# Altium PCB 2026.08.07.HMS.PD.CNHH.PcbDoc (part 1 of 2)
Units mm, origin at the board's own origin, x right, y up, seen from the top; angles counter-clockwise.
Board outline 110 x 110 mm, 2 copper layers (Top Layer, Bottom Layer); 168 components, 117 nets, 606 pads, 1355 vias.
Unrouted connection lines stored in the file: 4.
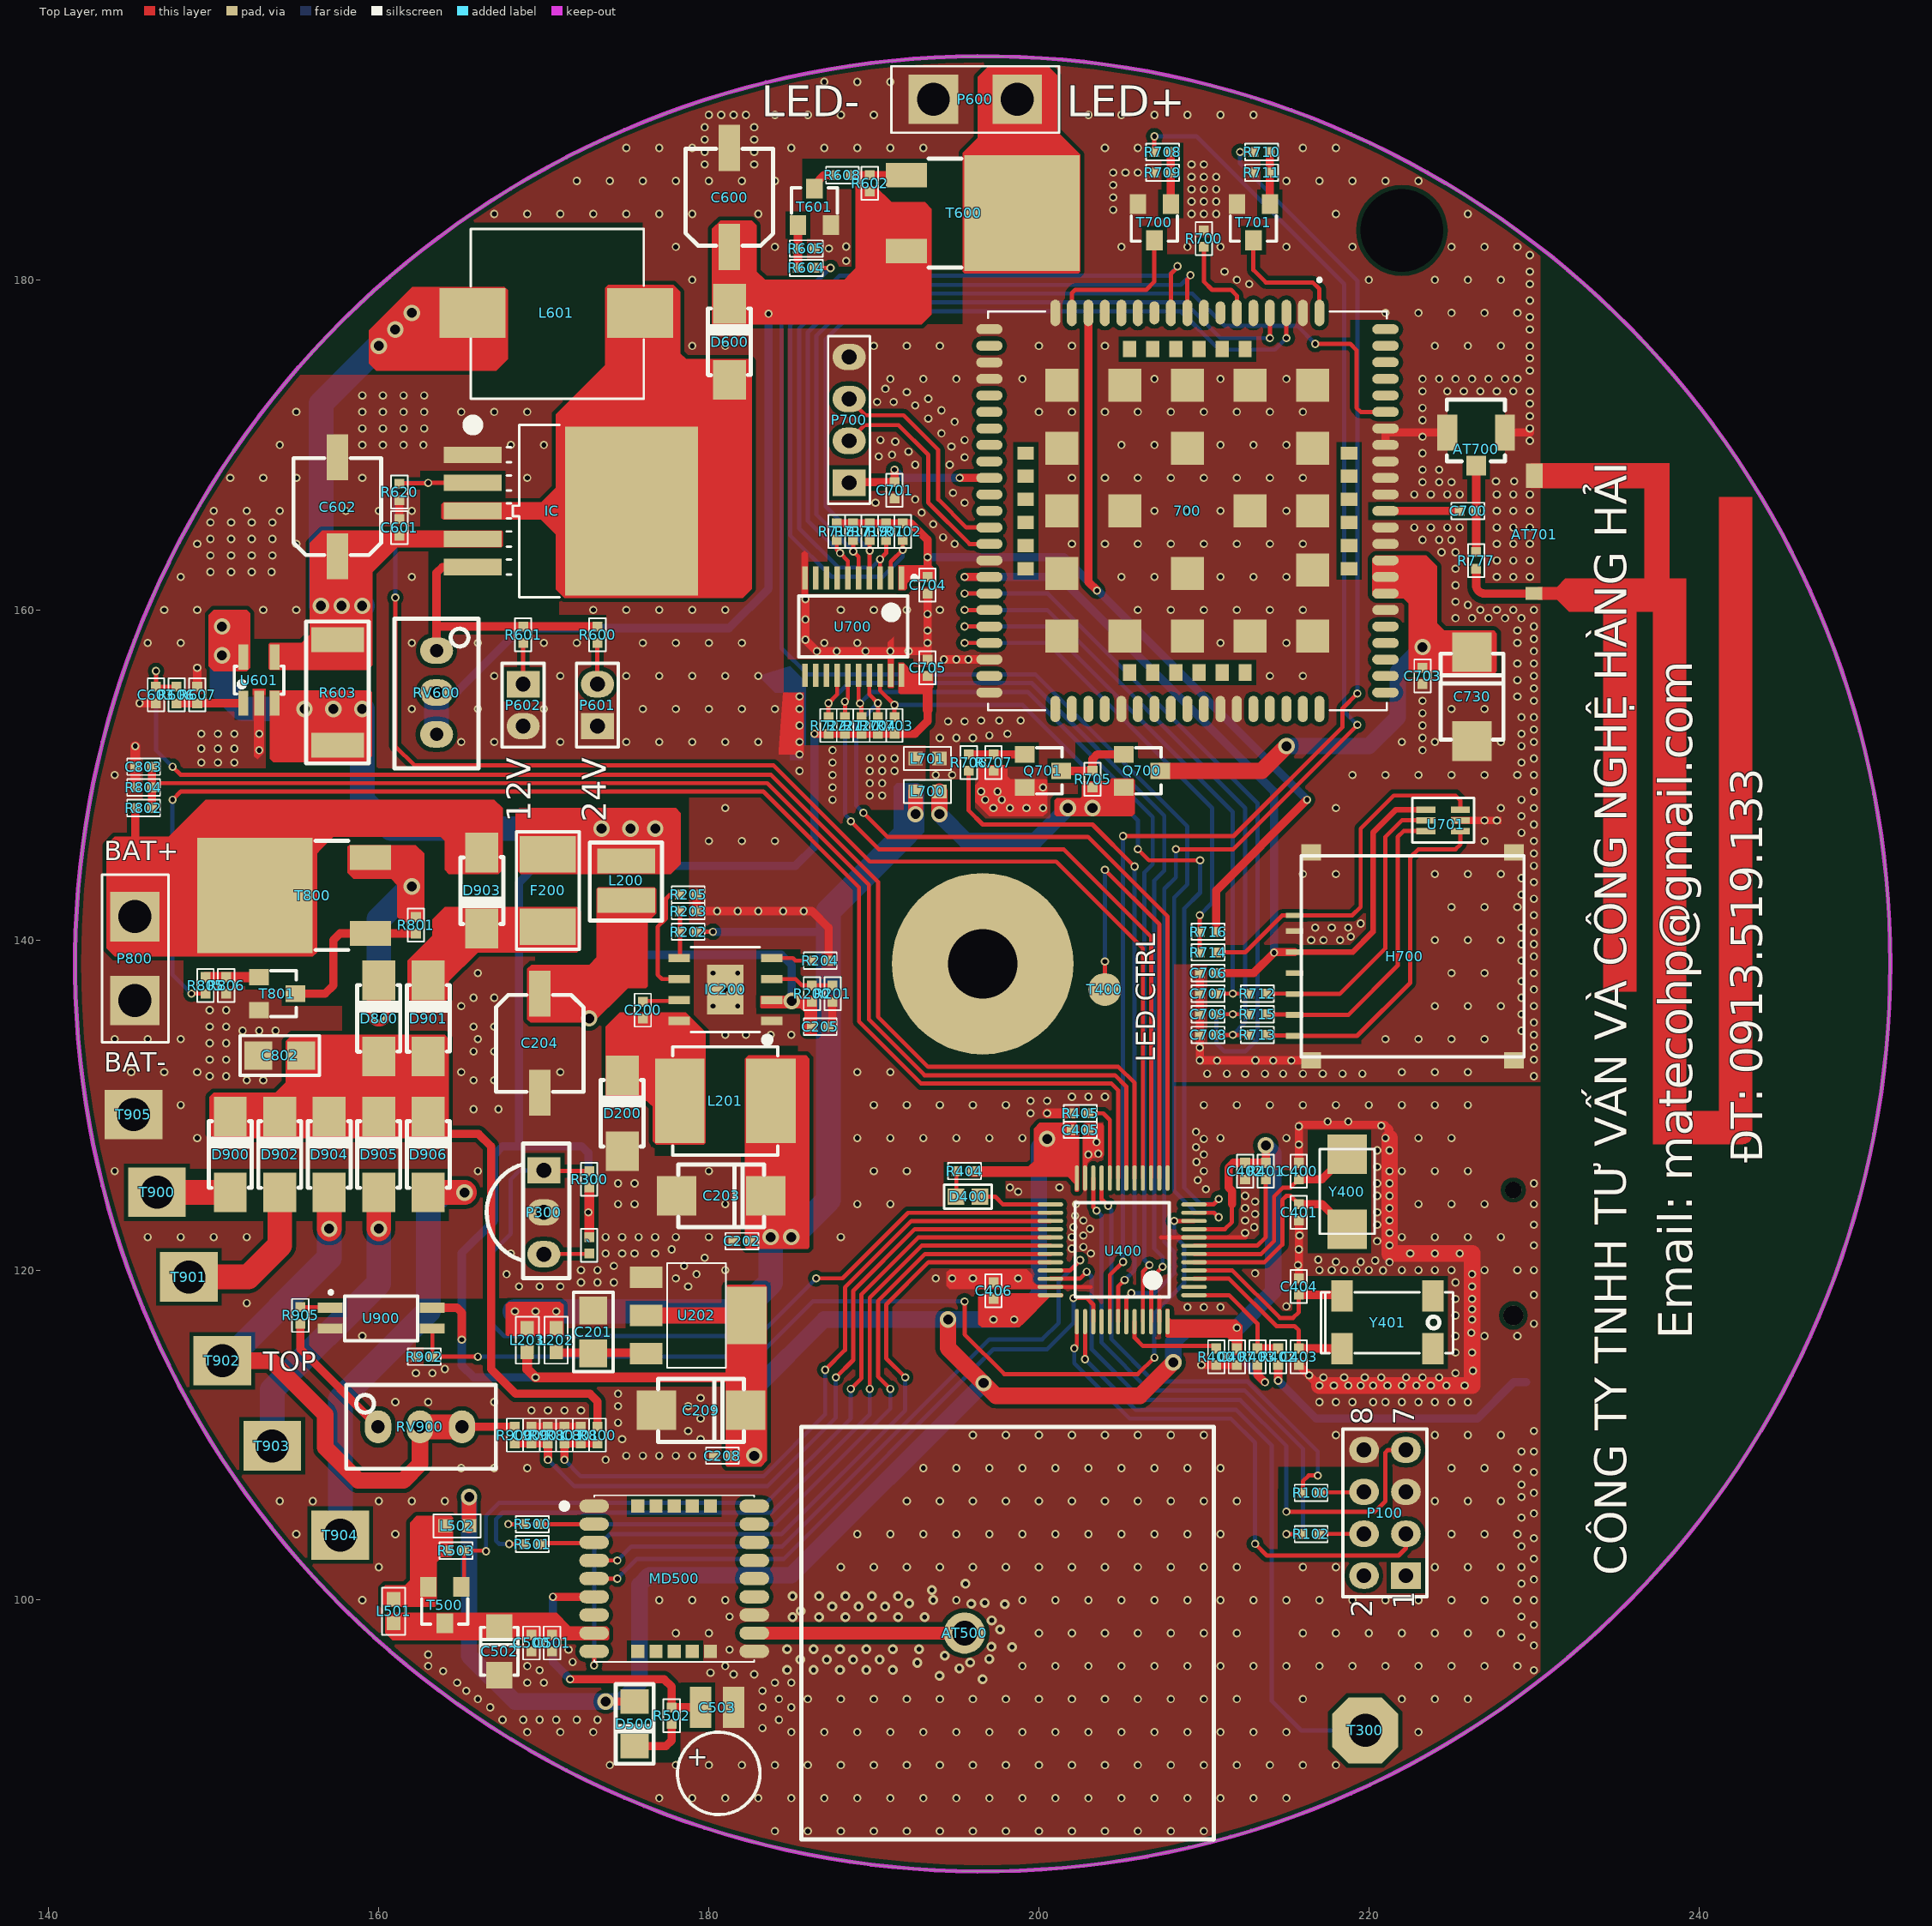
[diagram p0: Top Layer view]
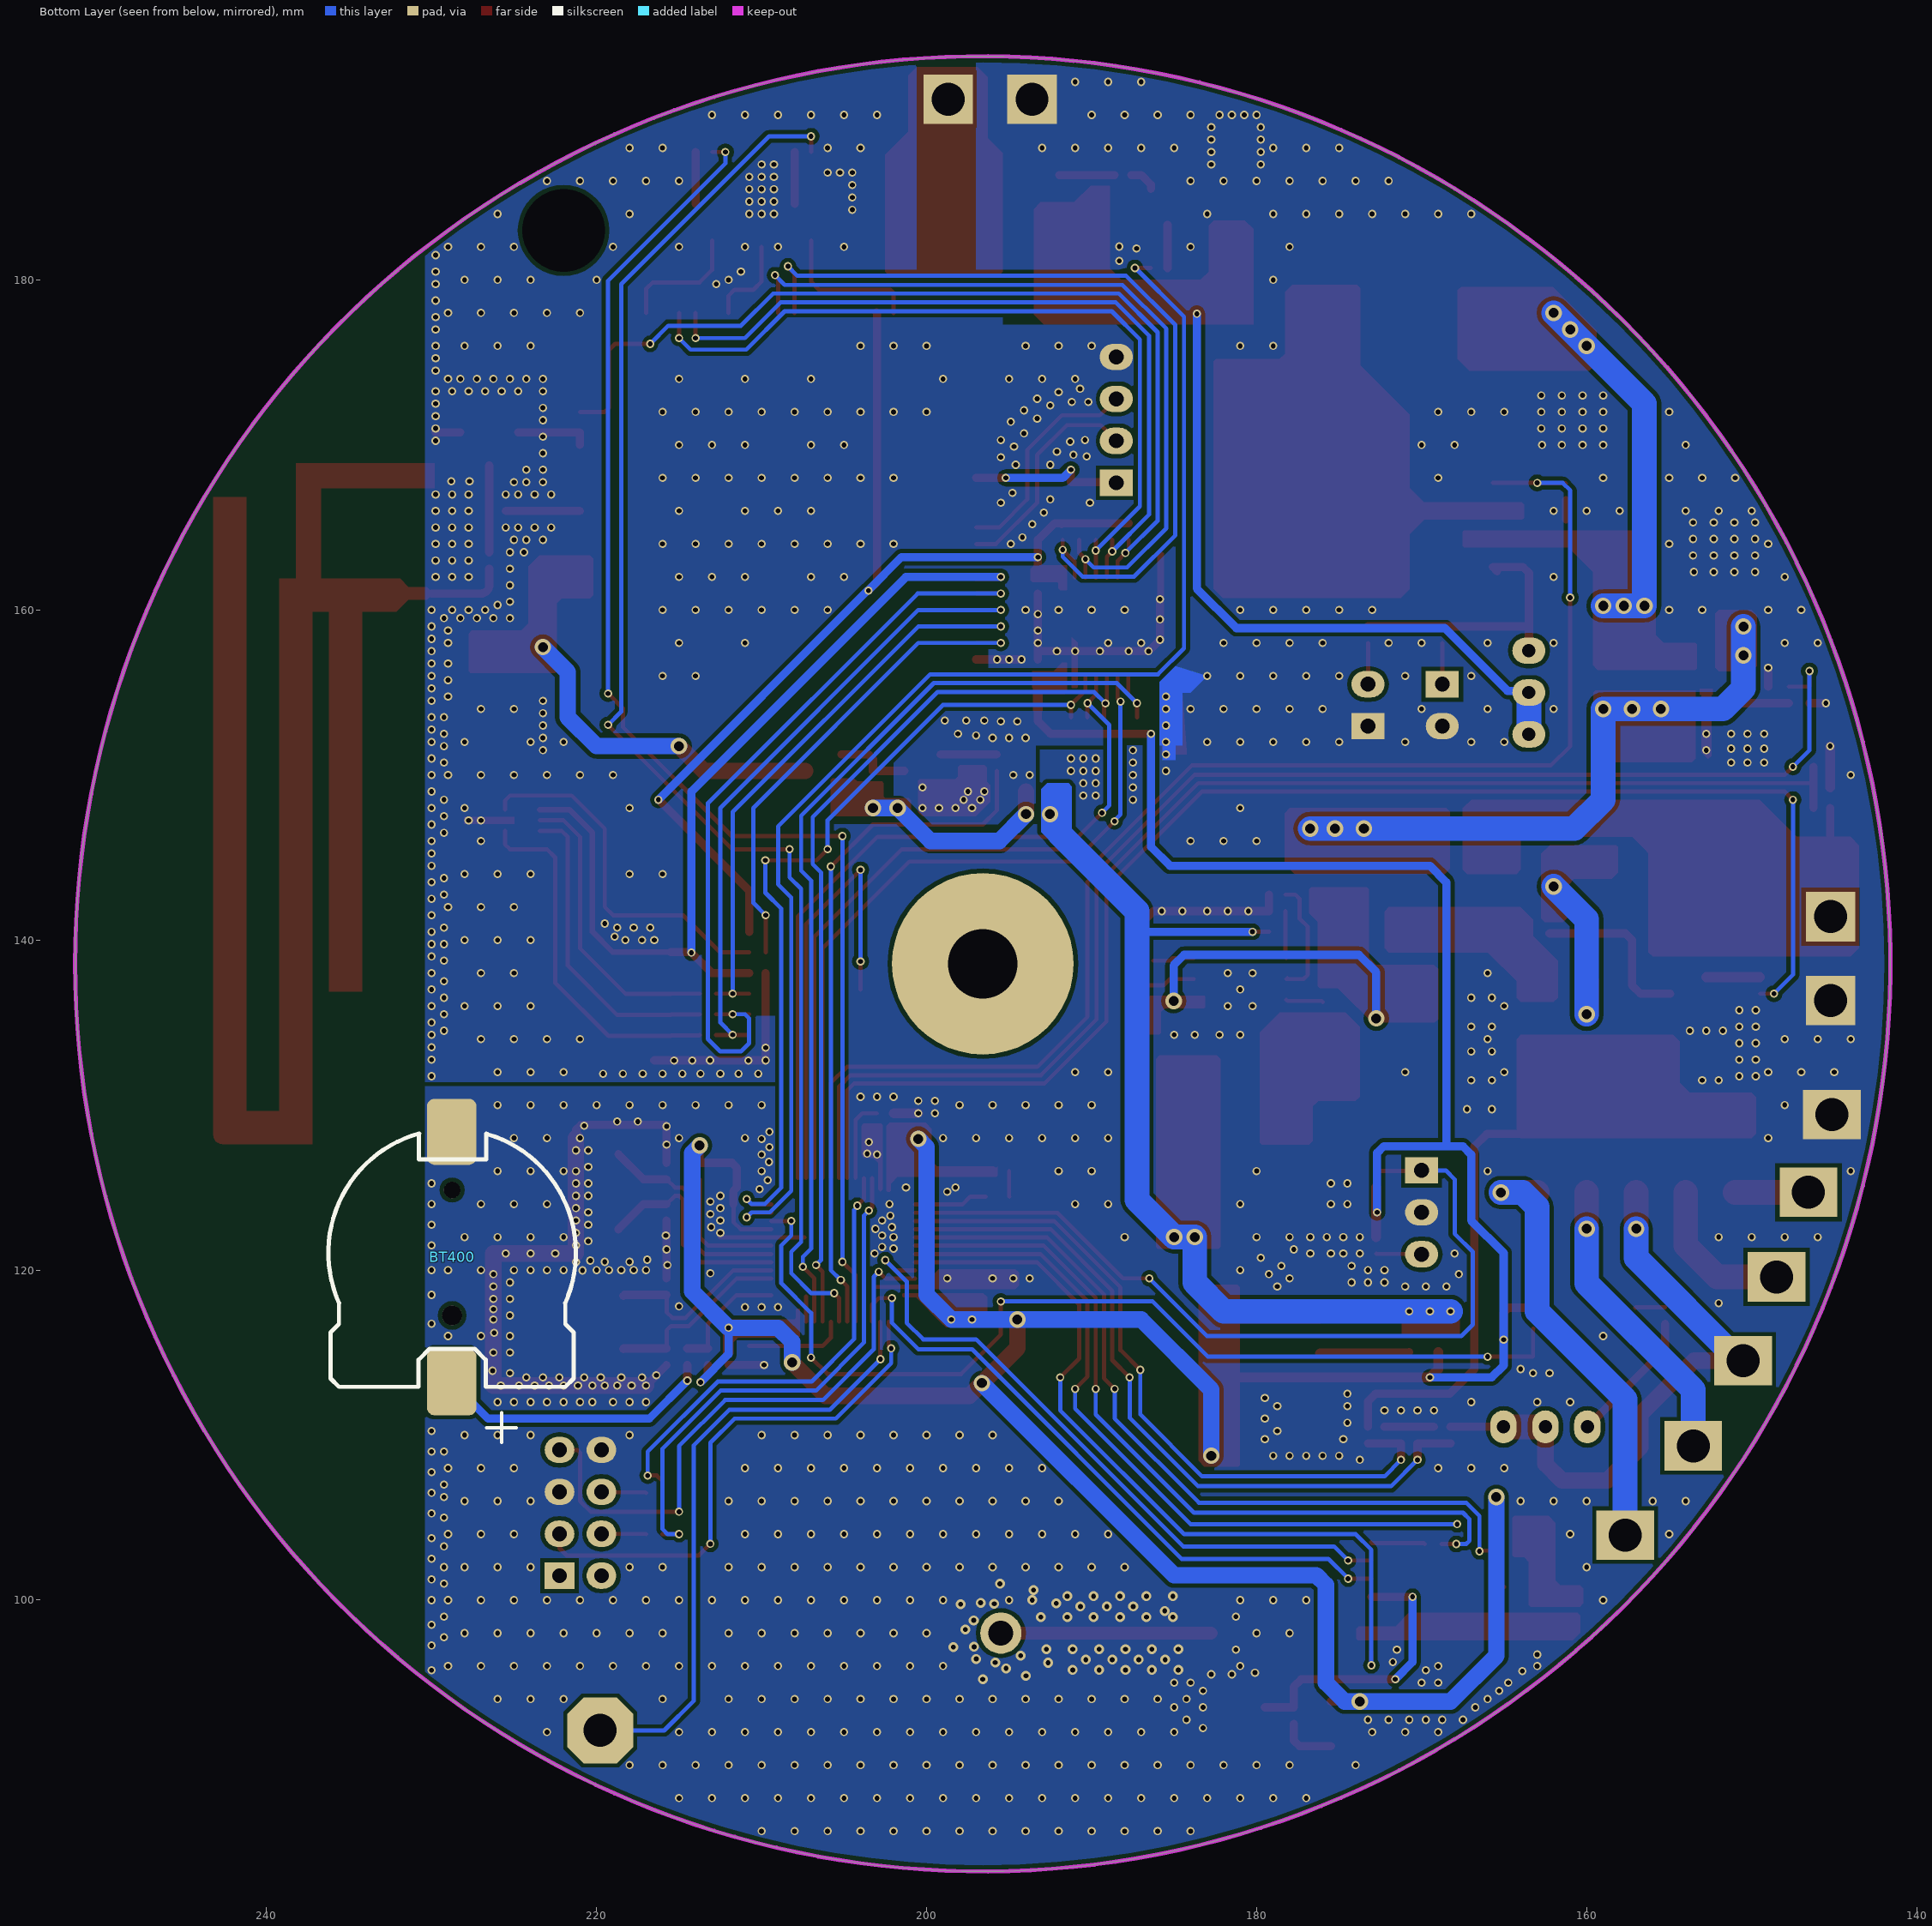
[diagram p1: Bottom Layer view, seen from below]
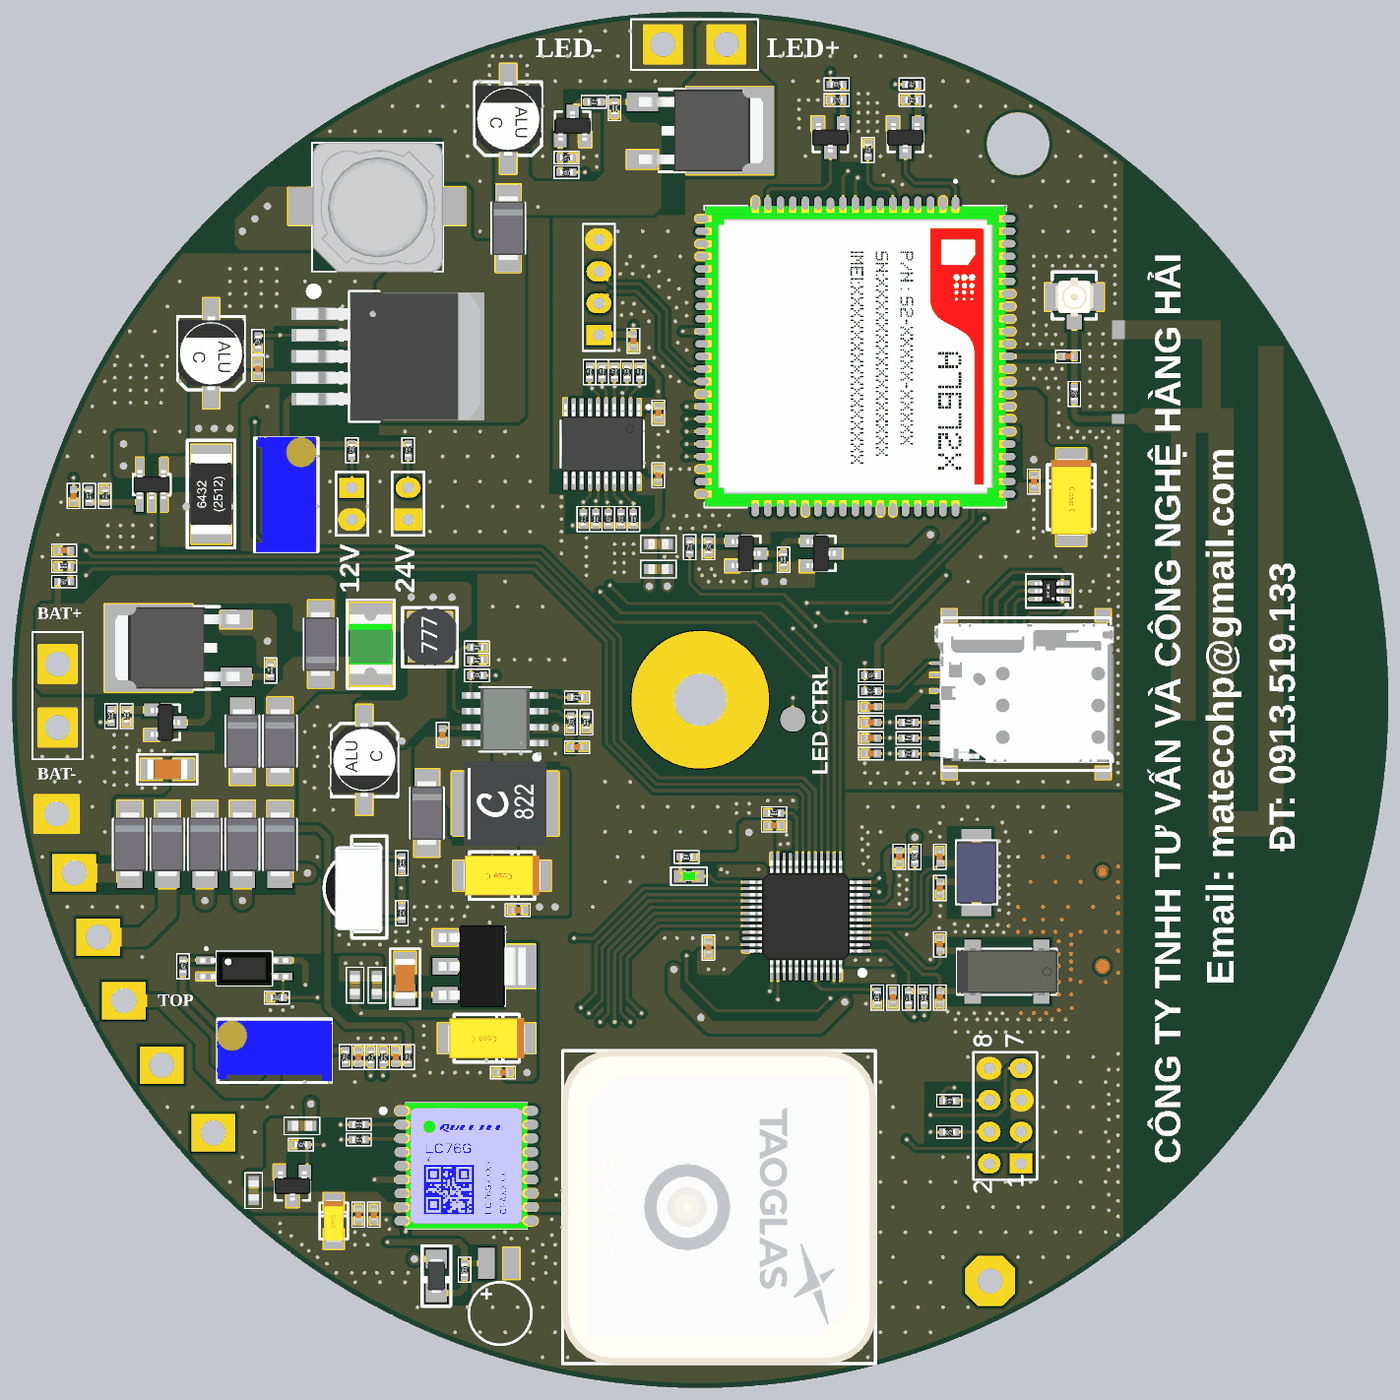
[diagram p3: 3D render of the assembled board from above, using the file's embedded part models]

## Layer stack, top to bottom
Top Solder: solder mask 0.0102, Solder Resist, Dk 3.5
Top Layer: signal copper 0.0356
Dielectric 1: dielectric 0.32, FR-4, Dk 4.8
Bottom Layer: signal copper 0.0356
Bottom Solder: solder mask 0.0102, Solder Resist, Dk 3.5

## Board outline
141.596,138.557 ccw(c196.596,138.557) 196.596,83.557 ccw(c196.596,138.557) 251.596,138.557 ccw(c196.596,138.557) 196.596,193.557 ccw(c196.596,138.557)

## Design rules (kind name [scope] priority, off if disabled: settings)
Clearance [not InComponent('U400','U701')] p1: gap=0.254
ComponentClearance [All] p1: gap=0 collisioncheckmode=3 verticalgap=0 showdistances=FALSE
HoleSize [All] p1: absolutevalues=TRUE maxlimit=25 minlimit=0.025 maxpercent=80.000 minpercent=20.000
PlaneConnect [All] p1: planeconnectstyle=Direct reliefexpansion=0.508 reliefentries=4 reliefconductorwidth=0.254 reliefairgap=0.254
PolygonConnect [All] p1: connectstyle=Direct reliefconductorwidth=0.254 reliefentries=4 polygonreliefangle="90 Angle" airgapwidth=0.254
RoutingVias [All] p1: holewidth=0.4 width=8 viastyle="Through Hole" minholewidth=0.3 minwidth=0.5 maxholewidth=0.6 maxwidth=1
SilkToSilkClearance [All] p1: silktosilkclearance=0
SilkToSolderMaskClearance [IsPad] p1: minsilkscreentomaskgap=0 clearancetoexposedcopper=TRUE
SolderMaskExpansion [All] p1: expansion=0.102
Width [All] p1: maxlimit=1.5 minlimit=0.254 preferedwidth=0.5
24 further rules are at their usual default settings.

## Classes and differential pairs
net class 50Ohm: NetAT500_1
component class HMS.Bootloader: P100 R100 R102
component class U_HMS.LC76G: AT500 C500 C501 C502 C503 D500 L501 L502 MD500 R500 R501 R502 R503 T500
component class HMS.LedCtrl: C600 C601 C602 C603 D600 IC L601 P600 P601 P602 R600 R601 R602 R603 R604 R605 R606 R607 R608 R620 RV600 T600 T601 U601
component class HMS.Power: C200 C201 C202 C203 C204 C205 C208 C209 D200 F200 IC200 L200 L201 L202 L203 R200 R201 R202 R203 R204 R205 U202
component class HMS.STM32L151CBT6: BT400 C400 C401 C402 C403 C404 C405 C406 C407 D400 R400 R401 R402 R403 R404 R405 T400 U400 Y400 Y401
component class U_HMS.SIM.A7677S: 700 AT700 AT701 C700 C701 C703 C704 C705 C706 C707 C708 C709 C730 g H700 L700 L701 P700 Q700 Q701 R700 R701 R702 R703 R704 R705 R706 R707 R708 R709 R710 R711 R712 R713 R714 R715 R716 R717 R718 R719 R720 R721 R722 R777 T700 T701 U700 U701
component class HMS_NiMHCharge: C801 C802 C803 D800 P800 R800 R801 R802 R803 R804 R805 R806 T800 T801
component class HMS_Solar: C900 D900 D901 D902 D903 D904 D905 D906 R900 R901 R902 R905 RV900 T900 T901 T902 T903 T904 T905 U900
component class HMS.VS1838B: ` P300 R300 T300

## Components (designator, comment, footprint, x,y, rotation, side; value= is the part's Value field where it differs from the comment)
700 "A767S2 S2-10AG4-Z31JP" SIM_A7672 217,178 r270 top
` "100R" RES_0402(1005) 172.75,121.5 r270 top
AT500 "GPS Antenna" "ANT GPS Passive" 195.5,98 r180 top
AT700 "NC" "IPEX SMD" 226.5,168.75 r270 top
AT701 "LTE Antenna" "Antenna LTE/4G PCB" 230,161 r0 top
BT400 "NC" "DE PIN NHO 3V3" 228.75,121.05 r270 bottom locked
C200 "104/50V" CAP_CERAMIC_0402(1005) 176,135.75 r90 top
C201 "106/50V" CAP_CERAMIC_1206(3216-18) 173,116.25 r270 top
C202 "104/50V" CAP_CERAMIC_0402(1005) 182,121.75 r0 top
C203 "107/10V" CAP_TANTAL_2312(6032-28) 180.75,124.5 r180 top
C204 "10uF/50V" CAP_ALUM_SMD_5054_TYPE_C 169.75,133.75 r90 top
C205 "104/50V" CAP_CERAMIC_0402(1005) 186.75,134.75 r180 top
C208 "104/50V" CAP_CERAMIC_0402(1005) 180.825,108.75 r0 top
C209 "107/10V" CAP_TANTAL_2312(6032-28) 179.525,111.5 r180 top
C400 "20pF/50V" CAP_CERAMIC_0402(1005) 215.75,126 r270 top
C401 "20pF/50V" CAP_CERAMIC_0402(1005) 215.75,123.5 r90 top
C402 "104/50V" CAP_CERAMIC_0402(1005) 212.5,126 r90 top
C403 "10pF/50V" CAP_CERAMIC_0402(1005) 215.75,114.75 r90 top
C404 "10pF/50V" CAP_CERAMIC_0402(1005) 215.75,119 r270 top
C405 "104/50V" CAP_CERAMIC_0402(1005) 202.5,128.5 r180 top
C406 "104/50V" CAP_CERAMIC_0402(1005) 197.25,118.75 r270 top
C407 "104/50V" CAP_CERAMIC_0402(1005) 212,114.75 r90 top
C500 "104/50V" CAP_CERAMIC_0402(1005) 169.25,97.4 r90 top
C501 "10pF/50V" CAP_CERAMIC_0402(1005) 170.5,97.4 r90 top
C502 "107/10V" CAP_TANTAL_1206(3216-18) 167.3,96.9 r270 top
C503 "NC" SPCAP0.22F 180.5,93.5 r180 top
C600 "10uF/50V" CAP_ALUM_SMD_5054_TYPE_C 181.25,185 r270 top
C601 "104/50V" CAP_CERAMIC_0402(1005) 161.25,165 r270 top
C602 "10uF/50V" CAP_ALUM_SMD_5054_TYPE_C 157.5,166.25 r270 top
C603 "104/50V" CAP_CERAMIC_0402(1005) 146.5,154.85 r90 top
C700 "100pF/50V" CAP_CERAMIC_0402(1005) 226,166 r180 top
C701 "104/50V" CAP_CERAMIC_0402(1005) 191.25,167.25 r270 top
C703 "104/50V" CAP_CERAMIC_0402(1005) 223.25,156 r90 top
C704 "104/50V" CAP_CERAMIC_0402(1005) 193.25,161.5 r90 top
C705 "104/50V" CAP_CERAMIC_0402(1005) 193.25,156.5 r270 top
C706 "104/50V" CAP_CERAMIC_0402(1005) 210.25,138 r0 top
C707 "20pF/50V" CAP_CERAMIC_0402(1005) 210.25,136.75 r0 top
C708 "20pF/50V" CAP_CERAMIC_0402(1005) 210.25,134.25 r0 top
C709 "20pF/50V" CAP_CERAMIC_0402(1005) 210.25,135.5 r0 top
C730 "107/10V" CAP_TANTAL_2312(6032-28) 226.25,154.75 r270 top
C801 "104/50V" CAP_CERAMIC_0402(1005) 172.25,110 r270 top
C802 "106/50V" CAP_CERAMIC_1206(3216-18) 154,133 r180 top
C803 "104/50V" CAP_CERAMIC_0402(1005) 145.75,150.5 r0 top
C900 "104/50V" CAP_CERAMIC_0402(1005) 169.25,110 r270 top
D200 "SS34" DO214AC_SMA_1808 174.75,129.5 r90 top
D400 "LED Red" LED_0603_GREEN 195.7,124.45 r0 top
D500 "1N4148W" DIODE_F03_1005 175.5,92.5 r270 top
D600 "SS54" DO214AC_SMA_1808 181.25,176.25 r90 top
D800 "SS34" DO214AC_SMA_1808 160,135.25 r90 top
D900 "SS34" DO214AC_SMA_1808 151,127 r90 top
D901 "SS34" DO214AC_SMA_1808 163,135.25 r90 top
D902 "SS34" DO214AC_SMA_1808 154,127 r90 top
D903 "SS34" DO214AC_SMA_1808 166.25,143 r270 top
D904 "SS34" DO214AC_SMA_1808 157,127 r90 top
D905 "SS34" DO214AC_SMA_1808 160,127 r90 top
D906 "SS34" DO214AC_SMA_1808 163,127 r90 top
F200 "1A/33V" MF-MSMF 170.25,143 r90 top
H700 "MUP-C7801-2" MUP-C7801 215.9,132.91 r90 top
IC "XL6019E1" TO-263-5 170.5,166 r270 top
IC200 "RY81020CP8" MK9019 181,137 r180 top
L200 "3.3uH" L2.1A_3.5_3.3 175,143.6 r180 top
L201 "10uH" L3A_7x7x3mm 181,130.25 r0 top
L202 "FBMJ1608HM230NT" Inductor_0603 170.75,115.75 r270 top
L203 "FBMJ1608HM230NT" Inductor_0603 169,115.75 r270 top
L501 "4A/23Ohm" Inductor_0603 160.9,99.323 r270 top
L502 "NC" Inductor_0603 164.75,104.5 r180 top
L601 "33uH" L3A_10x10x4mm 170.75,178 r0 top
L700 "FBMJ1608HM230NT" Inductor_0603 193.25,149 r0 top
L701 "FBMJ1608HM230NT" Inductor_0603 193.25,151 r0 top
MD500 "SIM65M-C" LC76G_GPS 173.05,105.7 r0 top
P100 "NC" HDR2X4 222.24,101.48 r90 top
P300 "VS1838B" IR_RECEIVER 170,123.5 r270 top
P600 "NC" H2_BIG 196.15,190.95 r180 top
P601 "24V" HDR1X2 173.25,154.23 r90 top
P602 "12V" HDR1X2 168.75,154.23 r270 top
P700 "NC" HDR1X4 188.5,171.52 r90 top
P800 "NC" H2_BIG 145.225,138.875 r270 top
Q700 "AO3415" SOT23-3 206.25,150.25 r270 top
Q701 "C1815" SOT23-3 200.25,150.25 r270 top
R100 "1K" RES_0402(1005) 216.5,106.5 r180 top
R102 "1K" RES_0402(1005) 216.5,104 r180 top
R200 "68K" RES_0402(1005) 186.25,136.75 r270 top
R201 "20K" RES_0402(1005) 187.5,136.75 r90 top
R202 "20K" RES_0402(1005) 178.75,140.5 r0 top
R203 "5.1K" RES_0402(1005) 178.75,141.75 r180 top
R204 "20K" RES_0402(1005) 186.75,138.75 r180 top
R205 "NC" RES_0402(1005) 178.75,142.75 r180 top
R300 "10K" RES_0402(1005) 172.75,125.5 r270 top
R400 "100K" RES_0402(1005) 210.75,114.75 r90 top
R401 "100K" RES_0402(1005) 213.75,126 r90 top
R402 "NC" RES_0402(1005) 214.5,114.75 r90 top
R403 "0R" RES_0402(1005) 213.25,114.75 r90 top
R404 "1K" RES_0402(1005) 195.5,126 r180 top
R405 "100K" RES_0402(1005) 202.5,129.5 r0 top
R500 "1K" RES_0402(1005) 169.3,104.6 r180 top
R501 "1K" RES_0402(1005) 169.3,103.4 r180 top
R502 "100R" RES_0402(1005) 177.75,93 r270 top
R503 "10K" RES_0402(1005) 164.675,103 r180 top
R600 "5.1K" RES_0402(1005) 173.25,158.5 r90 top
R601 "10K" RES_0402(1005) 168.75,158.5 r90 top
R602 "10K" RES_0402(1005) 189.75,185.85 r270 top
R603 "0.1R" RES_2512 157.5,155 r90 top
R604 "1K" RES_0402(1005) 185.9,180.725 r180 top
R605 "10K" RES_0402(1005) 185.9,181.9 r180 top
R606 "330R" RES_0402(1005) 147.75,154.85 r90 top
R607 "100K" RES_0402(1005) 149,154.85 r270 top
R608 "10K" RES_0402(1005) 188.1,186.35 r180 top
R620 "100K" RES_0402(1005) 161.25,167.15 r90 top
R700 "NC" RES_0402(1005) 210,182.5 r270 top
R701 "2K2" RES_0402(1005) 190.75,164.75 r90 top
R702 "2K2" RES_0402(1005) 191.75,164.75 r90 top
R703 "2K2" RES_0402(1005) 191.25,153 r270 top
R704 "2K2" RES_0402(1005) 190.25,153 r270 top
R705 "10K" RES_0402(1005) 203.25,149.75 r90 top
R706 "1K" RES_0402(1005) 195.75,150.75 r270 top
R707 "10K" RES_0402(1005) 197.25,150.75 r270 top
R708 "1K" RES_0402(1005) 207.5,187.75 r180 top
R709 "4.7K" RES_0402(1005) 207.5,186.5 r180 top
R710 "1K" RES_0402(1005) 213.5,187.75 r180 top
R711 "4.7K" RES_0402(1005) 213.5,186.5 r180 top
R712 "0R" RES_0402(1005) 213.25,136.75 r0 top
R713 "0R" RES_0402(1005) 213.25,134.25 r0 top
R714 "0R" RES_0402(1005) 210.25,139.25 r0 top
R715 "0R" RES_0402(1005) 213.25,135.5 r0 top
R716 "4.7K" RES_0402(1005) 210.25,140.5 r0 top
R717 "2K2" RES_0402(1005) 188.75,164.75 r90 top
R718 "2K2" RES_0402(1005) 187.75,164.75 r90 top
R719 "2K2" RES_0402(1005) 189.75,164.75 r90 top
R720 "2K2" RES_0402(1005) 189.25,153 r270 top
R721 "2K2" RES_0402(1005) 188.25,153 r270 top
R722 "2K2" RES_0402(1005) 187.25,153 r270 top
R777 "NC" RES_0402(1005) 226.5,163 r90 top
R800 "100K" RES_0402(1005) 173.25,110 r90 top
R801 "10K" RES_0402(1005) 162.25,140.9 r90 top
R802 "100K" RES_0402(1005) 145.75,148 r180 top
R803 "10K" RES_0402(1005) 171.25,110 r270 top
R804 "10K" RES_0402(1005) 145.75,149.25 r0 top
R805 "1K" RES_0402(1005) 149.5,137.25 r90 top
R806 "10K" RES_0402(1005) 150.75,137.25 r90 top
R900 "100K" RES_0402(1005) 168.25,110 r90 top
R901 "10K" RES_0402(1005) 170.25,110 r270 top
R902 "10K" RES_0402(1005) 162.75,114.75 r0 top
R905 "10K" RES_0402(1005) 155.25,117.25 r270 top
RV600 "204" RES_VAR_Type1 163.5,155 r270 top
RV900 "104" RES_VAR_Type1 162.5,110.5 r0 top
T300 "Test Point" TP 219.775,92.1 r0 top
T400 "Test Point" "Test Point SMD" 204,137 r90 top
T500 "AO3415" SOT23-3 164,99.7 r180 top
T600 "AOD409" TO252 197.5,184.05 r270 top
T601 "C1815" SOT23-3 186.4,184.425 r0 top
T700 "C1815" SOT23-3 207,183.5 r180 top
T701 "2SC1815" SOT23-3 213,183.5 r180 top
T800 "AOD409" TO252 153.968,142.7 r90 top
T801 "C1815" SOT23-3 153.85,136.75 r270 top
T900 "Test Point" TP_2 146.558,124.714 r180 top
T901 "Test Point" TP_2 148.488,119.583 r180 top
T902 "Test Point" TP_2 150.52,114.503 r180 top
T903 "Test Point" TP_2 153.543,109.347 r180 top
T904 "Test Point" TP_2 157.671,103.937 r180 top
T905 "Test Point" TP_2 145.15,129.425 r180 top
U202 "TLV1117LV33DCYR" LM1117-SOP 179.25,117.25 r270 top
U400 "STM32L151CBT6" LQFP48_L 205.05,121.225 r180 top locked
U601 "INA138NA/3K" SOT23-5 152.75,155.75 r0 top
U700 "TC7MPB9307FT(EL)" TSOP65P640X120-20N 188.75,159 r270 top
U701 "SMF05CT2G" SOT65P210X140-6N 224.5,147.25 r180 top
U900 "EL3H7(C)(TA)-G" "Opto small" 160.5,117.25 r0 top
Y400 "8Mhz" CRYSTAL_SMD_2PIN-5032 218.675,124.75 r90 top
Y401 "32.768KHz" ABS25-32768-6-T 221.125,116.825 r0 top

## Footprints (in the part's own frame and the unit in brackets; to place one, negate y for a bottom-side part, rotate by r counter-clockwise, add the part's x,y. Pads: shape width x height; smd on the part's side, far side on the other; paste and mask are expansions set on the pad)
ABS25-32768-6-T [mm] "CRYSTAL 32.768KHZ 6PF SMD"
  rect 1.3x1.9 smd: 1(-2.75,-1.6) 2(2.75,-1.6) 3(2.75,1.6) 4(-2.75,1.6)
  silkscreen extent -4.02,-1.85 3.98,1.83, body extent -4,-1.9 4,1.9, height 2.53
"ANT GPS Passive" [mm]
  round 2.5 hole 1.5: 1(0,0)
  silkscreen extent -15.1,-12.5 9.9,12.5, body extent -15.15,-12.55 9.95,12.55, height 4.73
"Antenna LTE/4G PCB" [mm]
  rect 1x0.77 smd paste+0 mask+0: 1(0,0)
  rect 1x1.5 smd paste+0 mask+0: 2(0.026,7.138)
  Top Layer region: 0.254,-0.38 1.397,-0.38 2.131,-1.114 4.216,-1.114 4.216,-24.126 6.215,-24.126 6.215,-1.114 7.216,-1.114 7.216,-33.362 12.67,-33.362 12.879,-33.32 13.056,-33.202 13.174,-33.025 13.216,-32.816 13.216,-32.816 13.216,5.843 11.214,5.843 11.214,-31.36 9.215,-31.36 9.215,0.888 8.217,0.888 8.217,7.885 -0.178,7.885 -0.178,6.387 6.713,6.387 6.713,0.888 1.902,0.888 1.4,0.385 0.257,0.385 0,0.128 0,-0.128
CAP_ALUM_SMD_5054_TYPE_C [mm]
  rect 2.8x1.3 smd: 1(3,0) 2(-3,0)
  silkscreen extent -2.95,-2.67 2.92,2.65, body extent -2.95,-2.65 2.95,2.65, height 5.41
CAP_CERAMIC_0402(1005) [mm] "Chip Inductor, Body 1.0x0.5mm, IPC High Density"
  rect 0.6x0.6 smd: 1(-0.5,0) 2(0.5,0)
  silkscreen extent -1,-0.5 1,0.5, body extent -0.5,-0.25 0.5,0.25, height 0.5
CAP_CERAMIC_1206(3216-18) [mm] "Chip Capacitor, Body 3.2x1.6mm, IPC High Density"
  rect 1.7x1.7 smd: 1(-1.3,0) 2(1.3,0)
  silkscreen extent -2.4,-1.2 2.4,1.2, body extent -1.6,-0.8 1.6,0.8, height 1
CAP_TANTAL_1206(3216-18) [mm] "Chip Capacitor, Body 3.2x1.6mm, IPC High Density"
  rect 1.6x1.6 smd: 1(-1.45,0) 2(1.45,0)
  silkscreen extent -1.45,-1.12 1.45,1.12, body extent -1.7,-0.8 1.7,0.8, height 1.65
CAP_TANTAL_2312(6032-28) [mm] "Chip Resistor, Body 6.0x3.2mm, IPC High Density"
  rect 2.4x2.4 smd: 1(-2.7,0) 2(2.7,0)
  silkscreen extent -2.6,-1.91 2.6,1.91, body extent -3.09,-1.6 3.09,1.6, height 2.69
CRYSTAL_SMD_2PIN-5032 [mm] "Crystal smd"
  rect 2.4x2.4 smd mask+0.025: 1(-2.275,0) 2(2.275,0)
  silkscreen extent -2.55,-1.67 2.58,1.65, body extent -2.5,-1.6 2.5,1.6, height 1.3
"DE PIN NHO 3V3" [mm]
  rrect30% 4x3 smd mask+0.051: 1(7.85,-0.025) 2(-7.325,-0.025)
  round 1 hole 1 unplated paste+0 mask+0: ""(-3.8,0)
  round 1.2 hole 1.2 unplated mask+0: ""(3.8,0)
  silkscreen extent -7.23,-7.5 11.5,7.5, body extent -9,-7.5 9.5,7.49, height 3.92
DIODE_F03_1005 [mm]
  rect 1.5x1.7 smd: 1(-1.35,0) 2(1.35,0)
  silkscreen extent -2.4,-1.14 2.41,1.16, body extent -1.35,-0.7 1.35,0.7, height 0.73
DO214AC_SMA_1808 [mm] "Diode B340, Diode M7"
  rect 2.4x2 smd: 1(-2.3,0) 2(2.3,0)
  silkscreen extent -2.02,-1.3 2.02,1.3, body extent -2.6,-1.3 2.6,1.3, height 2.42
H2_BIG [mm] "Euro Block"
  rect 3x3 hole 2: 1(-2.54,0) 2(2.54,0)
  silkscreen extent -5.08,-2 5.08,2.03, body extent -3.81,-1.27 3.81,1.27, height 1.5
HDR1X2 [mm] "Connector; Header; 2 Position"
  rect 1.6x2 hole 0.9: 1(-1.27,0)
  oval 1.6x2 hole 0.9: 2(1.27,0)
  silkscreen extent -2.54,-1.27 2.54,1.27, body extent -2.54,-1.27 2.54,1.27, height 7
HDR1X4 [mm] "Connector; Header; 4 Position"
  rect 1.6x2 hole 0.9: 1(-3.81,0)
  oval 1.6x2 hole 0.9: 2(-1.27,0) 3(1.27,0) 4(3.81,0)
  silkscreen extent -5.08,-1.27 5.08,1.27, body extent -5.08,-1.27 5.08,1.27, height 7
HDR2X4 [mm] "Connector; Header; 4x2 Position"
  rect 1.6x1.8 hole 0.9: 1(0,0)
  oval 1.6x1.8 hole 0.9: 2(0,2.54) 3(2.54,0) 4(2.54,2.54) 5(5.08,0) 6(5.08,2.54) 7(7.62,0) 8(7.62,2.54)
  silkscreen extent -1.27,-1.27 8.89,3.81, body extent -1.27,-1.27 8.89,3.81, height 7
Inductor_0603 [mil] "HK1608R22J-T"
  rect 34x32 smd paste+0 mask+0: 1(-28.54,0) 2(28.46,0)
  silkscreen extent -56,-28 56,28, body extent -32,-16 31,16, height 37
"IPEX SMD" [mm] "IPEX Connector SMD"
  rect 1.2x1.2 smd: 1(0,0)
  rect 2.2x1.2 smd: 2(-2,1.75) 2(-2,-1.75)
  silkscreen extent -4,-1.78 -0.25,1.75, body extent -3.55,-1.5 -0.45,1.5, height 1.25
IR_RECEIVER [mm] "TO, Flat Index; 3 In-Line, Axial Leads; Body Dia. 4.8mm; Leads 0.55 x 0.51 mm (max)"
  rect 1.6x2 hole 0.9: 1(-2.54,0)
  oval 1.6x2 hole 0.9: 2(0,0) 3(2.54,0)
  silkscreen extent -4.17,-3.46 3.99,1.55, body extent -3.62,-3.6 3.62,1.2, height 8.8
L2.1A_3.5_3.3 [mm]
  rect 3.5x1.5 smd: 1(0,-1.2) 2(0,1.2)
  silkscreen extent -2.16,-2.31 2.21,2.41, body extent -2.1,-2.31 2.1,2.31, height 3.47
L3A_7x7x3mm [mm]
  rect 3x5.12 smd: 1(-2.764,0) 2(2.764,0)
  silkscreen extent -3.18,-3.28 3.18,3.28, body extent -3.28,-3.38 3.28,3.38, height 6.1
L3A_10x10x4mm [mm]
  rect 4x3 smd: 1(-5.08,0) 2(5.08,0)
  silkscreen extent -5.18,-5.21 5.31,5.08, body extent -5.12,-5.28 5.28,5.12, height 6.25
LC76G_GPS [mm] "Modlue GNSS"
  rrect100% 1.8x0.8 smd mask+0.05: 1(0,0) 2(0,-1.1) 3(0,-2.2) 4(0,-3.3) 5(0,-4.4) 6(0,-5.5) 7(0,-6.6) 8(0,-7.7) 9(0,-8.8) 10(9.7,-8.8) 11(9.7,-7.7) 12(9.7,-6.6) 13(9.7,-5.5) 14(9.7,-4.4) 15(9.7,-3.3) 16(9.7,-2.2) 17(9.7,-1.1) 18(9.7,0)
  rect 0.8x0.8 smd mask+0.05: 19(7.05,0) 20(5.95,0) 21(4.85,0) 22(3.75,0) 23(2.65,0) 24(2.65,-8.8) 25(3.75,-8.8) 26(4.85,-8.8) 27(5.95,-8.8) 28(7.05,-8.8)
  silkscreen extent -1.9,-9.45 9.7,0.65, body extent 0,-9.45 9.7,0.65, height 2.4
LED_0603_GREEN [mm] "Chip Capacitor, Body 1.6x0.8mm, IPC High Density"
  rect 1x1 smd: 1(-0.725,0) 2(0.725,0)
  silkscreen extent -1.45,-0.73 1.45,0.72, body extent -0.8,-0.4 0.8,0.4, height 0.6
LM1117-SOP [mm]
  rect 1.3x2 smd: 1(-2.3,-3.048) 2(0,-3.048) 3(2.3,-3.048)
  rect 3.5x2.4 smd: 2(0,3.048)
  silkscreen extent -3.18,-1.78 3.18,1.78, body extent -3.25,-3.56 3.25,3.4, height 1.68
LQFP48_L [mm] "Thin QFP, 48-Leads, Body 7x7mm, Pitch 0.5mm, IPC High Density"
  round 0.8 on Top Overlay: 0(-4.5,4.5)
  oval 1.55x0.25 smd: 1(-4.35,2.75) 2(-4.35,2.25) 3(-4.35,1.75) 4(-4.35,1.25) 5(-4.35,0.75) 6(-4.35,0.25) 7(-4.35,-0.25) 8(-4.35,-0.75) 9(-4.35,-1.25) 10(-4.35,-1.75) 11(-4.35,-2.25) 12(-4.35,-2.75) 25(4.35,-2.75) 26(4.35,-2.25) 27(4.35,-1.75) 28(4.35,-1.25) 29(4.35,-0.75) 30(4.35,-0.25) 31(4.35,0.25) 32(4.35,0.75) 33(4.35,1.25) 34(4.35,1.75) 35(4.35,2.25) 36(4.35,2.75)
  oval 0.25x1.55 smd: 13(-2.75,-4.35) 14(-2.25,-4.35) 15(-1.75,-4.35) 16(-1.25,-4.35) 17(-0.75,-4.35) 18(-0.25,-4.35) 19(0.25,-4.35) 20(0.75,-4.35) 21(1.25,-4.35) 22(1.75,-4.35) 23(2.25,-4.35) 24(2.75,-4.35) 37(2.75,4.35) 38(2.25,4.35) 39(1.75,4.35) 40(1.25,4.35) 41(0.75,4.35) 42(0.25,4.35) 43(-0.25,4.35) 44(-0.75,4.35) 45(-1.25,4.35) 46(-1.75,4.35) 47(-2.25,4.35) 48(-2.75,4.35)
  silkscreen extent -2.85,-2.85 2.85,2.85, body extent -4.5,-4.5 4.5,4.5, height 1.6
MF-MSMF [mm]
  rect 2.2x3.4 smd: 1(-2.2,0) 2(2.2,0)
  silkscreen extent -3.56,-1.91 3.56,1.91, body extent -2.36,-1.74 2.37,1.74, height 1.03
MK9019 [mm]
  rect 1.3x0.508 smd paste+0 mask+0: 1(-2.803,1.905) 2(-2.803,0.635) 3(-2.803,-0.635) 4(-2.803,-1.905) 5(2.803,-1.905) 6(2.803,-0.635) 7(2.803,0.635) 8(2.803,1.905)
  rect 2.2x3 smd paste+0 mask+0: EPAD(0,0)
  silkscreen extent -2.67,-2.58 2.08,3.17, body extent -3.1,-2.45 3.1,2.45, height 1.76
MUP-C7801 [mm] "Push-Push NANO-SIM Card"
  rect 0.35x1.04 smd: 1(6.36,0.4) 2(3.82,0.4) 3(1.28,0.4) 5(7.63,0.4) 6(5.09,0.4) 7(2.55,0.4)
  rect 1x1.2 smd: 5(-0.2,-0.6) 5(-0.2,-12.9) 5(12.4,-0.6) 5(12.4,-12.9)
  rect 0.3x1.04 smd: 8(8.58,0.4)
  silkscreen extent 0,-13.5 12.2,0, body extent 0.57,-13.75 11.79,0.6, height 1.25
"Opto small" [mm]
  rect 1.5x0.6 smd: 1(-3.454,0.468) 2(-3.454,-0.802) 3(2.746,-0.802) 4(2.746,0.468)
  silkscreen extent -3.5,-1.53 1.85,1.5, body extent -3.85,-1.53 3.15,1.17, height 2.01
RES_0402(1005) [mm] "Chip Inductor, Body 1.0x0.5mm, IPC High Density"
  rect 0.6x0.6 smd: 1(-0.5,0) 2(0.5,0)
  silkscreen extent -1,-0.5 1,0.5, body extent -0.5,-0.25 0.5,0.25, height 0.35
RES_2512 [mm]
  rect 1.5x3.2 smd: 1(-3.2,0) 2(3.2,0)
  silkscreen extent -4.3,-1.9 4.3,1.9, body extent -3.2,-1.6 3.2,1.6, height 0.6
RES_VAR_Type1 [mm] "Bien tro vi chinh"
  oval 1.6x2 hole 0.8: 1(-2.54,0) 2(0,0) 3(2.54,0)
  silkscreen extent -4.47,-2.54 4.6,2.54, body extent -4.54,-2.4 4.66,2.4, height 12.02
SIM_A7672 [mm]
  oval 1.6x0.6 smd: 1(0,0) 2(0,-1) 3(0,-2) 4(0,-3) 5(0,-4) 6(0,-5) 8(0,-7) 9(0,-8) 10(0,-9) 12(0,-11) 13(0,-12) 14(0,-13) 15(0,-14) 16(0,-15) 17(0,-16) 35(24,-16) 36(24,-15) 37(24,-14) 38(24,-13) 39(24,-12) 40(24,-11) 41(24,-10) 42(24,-9) 43(24,-8) 44(24,-7) 45(24,-6) 46(24,-5) 47(24,-4) 48(24,-3) 49(24,-2) 50(24,-1) 51(24,0)
  oval 1.4x0.6 smd: 7(0,-6) 11(0,-10)
  oval 0.6x1.6 smd: 18(4,-20) 19(5,-20) 20(6,-20) 21(7,-20) 22(8,-20) 23(9,-20) 24(10,-20) 25(11,-20) 26(12,-20) 27(13,-20) 28(14,-20) 29(15,-20) 30(16,-20) 31(17,-20) 32(18,-20) 33(19,-20) 34(20,-20) 52(20,4) 53(19,4) 54(18,4) 55(17,4) 56(16,4) 57(15,4) 58(14,4) 59(13,4) 60(12,4) 61(11,4) 62(10,4) 63(9,4) 64(8,4) 65(7,4) 66(6,4) 67(5,4) 68(4,4) 89(0.99,-20) 90(1.99,-20) 91(3,-20) 92(21,-20) 93(22,-20) 94(23,-20) 95(23,4) 96(22,4) 97(21,4) 98(2.99,4) 99(1.99,4) 100(0.99,4)
  rect 2x2 smd: 69(4.389,-0.4) 70(4.389,-4.2) 71(4.389,-8) 72(4.389,-11.8) 73(4.389,-15.6) 74(8.189,-15.6) 75(11.989,-15.6) 76(15.789,-15.6) 77(19.589,-15.6) 78(19.589,-11.8) 79(19.589,-8) 80(19.589,-4.2) 81(19.589,-0.4) 82(15.589,-0.4) 83(11.989,-0.4) 84(8.189,-0.4) 85(8.189,-8) 86(11.989,-11.8) 87(15.789,-8) 88(11.989,-4.2)
  rect 1x0.8 smd: 101(2.19,-4.5) 102(2.19,-5.9) 103(2.19,-7.3) 104(2.19,-8.7) 105(2.19,-10.1) 106(2.19,-11.5) 113(21.79,-11.5) 114(21.79,-10.1) 115(21.79,-8.7) 116(21.79,-7.3) 117(21.79,-5.9) 118(21.79,-4.5)
  rect 0.8x1 smd: 107(8.5,-17.8) 108(9.9,-17.8) 109(11.3,-17.8) 110(12.7,-17.8) 111(14.1,-17.8) 112(15.5,-17.8) 119(15.5,1.8) 120(14.1,1.8) 121(12.7,1.8) 122(11.3,1.8) 123(9.9,1.8) 124(8.5,1.8)
  silkscreen extent -2.1,-20.07 24.07,4.08, body extent 0,-20 24,4, height 3.02
SOT23-3 [mm]
  round 0.5 on Top Overlay: 1(-1.016,0)
  rect 1x1.2 smd: 1(-1,-1.1) 2(1,-1.1) 3(0,1.1)
  silkscreen extent -1.4,-0.38 1.4,1.15, body extent -1.46,-1.17 1.46,1.17, height 1
SOT23-5 [mm]
  rect 0.6x1.524 smd: 1(-0.95,-1.4) 2(0,-1.4) 3(0.95,-1.4) 4(0.95,1.4) 5(-0.95,1.4)
  silkscreen extent -1.5,-0.85 1.5,0.85, body extent -1.46,-1.17 1.46,1.17, height 1
SOT65P210X140-6N [mm] "SOT23, 6-Leads, Body 2.00x2.10mm, Pitch 0.65mm, IPC Medium Density"
  round 0.4 on Top Overlay: 0(-1.4,1.1)
  rect 1.15x0.4 smd: 1(-1.05,0.65) 2(-1.05,0) 3(-1.05,-0.65) 4(1.05,-0.65) 5(1.05,0) 6(1.05,0.65)
  silkscreen extent -1.88,-1.35 1.88,1.35, body extent -1.13,-1 1.13,1, height 1
SPCAP0.22F [mm]
  rect 1.3x2.5 smd: 1(1,0) 2(-1,0)
  silkscreen extent -2.6,1.5 2.4,6.5
"Test Point SMD" [mm]
  round 2 smd: 1(0,0)
TO252 [mm]
  rect 1.5x2.5 smd: 1(-2.3,-5.532) 3(2.3,-5.532)
  rect 7x7 smd: 2(0,1.468)
  silkscreen extent -3.3,-4.19 3.3,-2.2, body extent -3.27,-5.81 3.27,4.13, height 2.41
TO-263-5 [mm]
  rect 1x3.5 smd paste+0 mask+0: 1(-3.4,-4.815) 2(-1.7,-4.815) 3(0,-4.815) 4(1.7,-4.815) 5(3.4,-4.815)
  rect 10.236x8.071 smd paste+0 mask+0: 6(0,4.815)
  silkscreen extent -5.33,-4.93 5.22,0.46, body extent -5.09,-6.19 5.09,8.49, height 4.68
TP [mm] "TestPoint"
  oct 4x4 hole 2: 1(0,0)
TP_2 [mm] "TestPoint"
  rect 3.5x3 hole 2: 1(0,0)
TSOP65P640X120-20N [mm] "TSOP, 20-Leads, Body 6.50x4.40mm, Pitch 0.65mm, IPC Medium Density"
  rect 1.4x0.35 smd: 1(-2.95,2.925) 2(-2.95,2.275) 3(-2.95,1.625) 4(-2.95,0.975) 5(-2.95,0.325) 6(-2.95,-0.325) 7(-2.95,-0.975) 8(-2.95,-1.625) 9(-2.95,-2.275) 10(-2.95,-2.925) 11(2.95,-2.925) 12(2.95,-2.275) 13(2.95,-1.625) 14(2.95,-0.975) 15(2.95,-0.325) 16(2.95,0.325) 17(2.95,0.975) 18(2.95,1.625) 19(2.95,2.275) 20(2.95,2.925)
  silkscreen extent -3.07,-3.3 1.85,3.83, body extent -3.2,-3.25 3.2,3.25, height 1

## Part data
700: library part SIM_A7672
` R502: library part Res1, "RES 100 OHM 1% 1/8W 0402"
AT500: library part "Antenna GPS Passive", "SWG018-35, Passive antenna 25x25x4mm, pin length 3.5mm, Three-proof varnish"
AT700: library part IPEX-AT, "IPEX SMD"
AT701: library part "Antenna GSM/LTE PCB"
BT400: library part Battery
C200 C202 C500 C501 C603 C801 C803 C900: library part "Cap Cer 0603 (1608)", "CAP CER 0.1UF 50V X5R 0402"
C201: library part CL31A106KOHNNNE, "CAP Ceramic 106/50V 10% 1206"
C203 C730: library part "Cap Tantal 2312 (6032-28)", "Capacitor Tantalum 100uF/10V 2312(6032-28)"
C204: library part UWT1C221MCL1GS, "Capacitor Alum 10uF/50V SMD 5x5.4mm"
C205 C208 C704 C705: library part Cap, "CAP CER 0.1UF 50V X5R 0402"
C209: library part UWT1C221MCL1GS, "Cap Tantal 10uF/6.3V 10% 1206"
C400 C401: library part "Cap Cer 0603 (1608)", "CAP CER 20PF 50V C0G/NP0 0402"
C402 C405 C406 C407: library part C0603C104K5RACTU, "CAP CER 0.1UF 50V X5R 0402"
C403: library part "Cap Cer 0603 (1608)", "CAP CER 10PF 50V C0G/NP0 0402"
C404: library part "Cap Cer 0603 (1608)", "Capacitor Ceramic 10pF/50V 10% 0603"
C502: library part "Cap Tantal 2312 (6032-28)", "Cap Tantal 10uF/6.3V 10% 1206"
C503: library part DCK-3R3E224U-E
C600 C602: library part "Cap Tantal 2917 (7343-31)", "Capacitor Alum 10uF/50V SMD 5x5.4mm"
C601: library part "Cap Cer 0805 (2012)", "CAP CER 0.1UF 50V X5R 0402"
C700: library part CC0402FRNPO9BN101, "CAP CER 100PF 50V C0G/NPO 0402"
C701 C706: library part CC0603KPX7R9BB104, "CAP CER 0.1UF 50V X5R 0402"
C703: library part C0603C104K5RACTU, "T? Ceramic 104/50V 10% 0603"
C707 C708 C709: library part CC0402GRNPO9BN200, "CAP CER 20PF 50V C0G/NPO 0402"
C802: library part Cap, "CAP Ceramic 106/50V 10% 1206"
D200 D800 D900 D901 D902 D903 D904 D905 D906: library part "Diode B340A", "Diode Schottky 3A/40V DO-214AB"
D400: library part "LED 3mm", "LED RED SMD 0402"
D500: library part "Diode F03", "1N4148 T4 SOD-123/1206 1N4148W"
D600: library part "Diode B340A", "Diode Schottky 5A/40V DO-214AB"
F200: library part RKEF110, "PTC RESET FUSE 33V 1A SMD 1812"
H700: library part MUP-C7801, "Nano Sim card Socket"
IC: "XL6019E1 IC Boost 5A TO-263-5"
IC200: library part MK9019, "100V Input, Ultra-Low IQ, Synchronous Buck Converter"
L200: library part Inductor, "Inductor SMD 3.3uH CD43-3R3 3.5*3*2.1mm"
L201: library part "Inductor Iron", "Inductor 10uH 7x7x4mm"
L202 L203: library part CBC2012T470M, "Inductor Ferrites 4A SMD 0603"
L501: library part FBMJ1608HM230NT, "Inductor Ferrites 4A SMD 0603"
L502: library part CBC2012T470M, "47nH"
L601: library part CBC2012T470M, "INDUCTOR 33uH SMD CDRH127-330"
L700 L701: library part CBC2012T470M, "INDUCTOR 200nH 20% 0805 SMD"
MD500: library part LC76G, "Compact GNSS Module"
P100: library part "Header 4X2", "Header, 4-Pin, Dual row"
P300: library part "Header 3", "Diode Infrared Receiver 38Khz"
P600 P601 P602 P800: library part "Header 2", "Header, 2-Pin"
P700: library part USB-M
Q700: library part 2N3906, "Mosfet P Channel"
Q701: library part 2N3904, "Trans C1815 NPN 0.15A/50V SMD SOT23"
R100 R102 R404 R604 R706 R710: library part Res1, "RES 1K OHM 1% 1/8W 0402"
R200: library part Res1, "RES 68K OHM 5% 1/8W 0402"
R201 R204: library part Res1, "RES 20K OHM 1% 1/8W 0402"
R202: library part Res1, "RES 20K OHM 5% 1/8W 0402"
R203 R600: library part Res1, "RES 5.1K OHM 5% 1/8W 0402"
R300 R601 R602 R605 R608 R705 R707 R801 R803 R804 R806 R901 R902 R905: library part Res1, "RES 10K OHM 5% 1/8W 0402"
R400 R401 R405 R607 R800 R802 R900: library part Res1, "Resistor 100K 1/8W 1% 0402"
R402: library part Res1, "Resistor"
R403: library part Res1, "RES 0 OHM 1/8W 0402"
R500 R501: library part RC0402FR-071KL, "RES 1K OHM 1% 1/8W 0402"
R503: library part RC0402JR-0710KL, "RES 10K OHM 5% 1/8W 0402"
R603: library part "Res 1W", "Res 1W 0.1R 1% SMD 2512"
R606: library part Res1, "RES 330 OHM 1% 1/8W 0402"
R620: library part Res1, "RES 100K OHM 5% 1/8W 0402"
R700: library part RT0603BRD071KL
R701 R702 R703 R704 R717 R718 R719 R720 R721 R722: library part RC0402JR-072K2L, "RES 2.2K OHM 1/8W 0402"
R708: library part Res1, "Tr? 1K 1/8W 1% 0603"
R709 R711: library part Res1, "RES 4.7K 1% 1/8W 0402"
R712 R713 R714 R715: library part RC0402FR-070RL, "RES 0 OHM JUMPER 1/16W 0402"
R716: library part RC0402JR-074K7P, "RES SMD 4.7K OHM 5% 1/16W 0402"
R777: library part Res1, "Tr? 10K 1/8W 1% 0603"
R805: library part Res1, "Resistor 1K 1/8W 1% 0603"
RV600: library part Res_Vol_Single, "Volume Varistor Single 200K"
RV900: library part Res_Vol_Single, "Volume Varistor Single 100K"
T500: library part A03415, "Mosfet P Channel"
T600 T800: library part AOD4185, "MOSFET P-CH 60V 26A TO252"
T601 T700 T701: library part 2SC1815-HF, "Trans C1815 NPN 0.15A/50V SMD SOT23"
T801: library part 2SC1815-HF, "Transistor  50V 150mA  NPN SMD SOT-23"
U202: "800mA and 1A Low Dropout Positive Regulator 3.3V"
U400: "STM32L ARM-based EnergyLite 32-bit MCU, 128 kB Flash, 16 kB Internal RAM, -40 to +85°C Temperature, 32-pin LQFP, Tray"
U601: library part INA138, "IC Current Monitor Regulator 0.5% SOT-23-5"
U700: library part TC7MPB9307FK, "IC Logic Convert 1.8V 3.3V 20-VSSOP"
U701: library part SMF05C, "TVS Diode Array For ESD and Latch-Up Protection"
U900: library part OPTOISO1, "Optoisolator Transistor Output 3750Vrms 1 Channel 4-SOP"
Y400: library part XTAL, "Crystal 8Mhz 20pF SMD 5032"
Y401: library part ABS25-32768-6-T, "CRYSTAL 32.768KHZ 6PF SMD"

## Free pads (board coordinates)
  round 11 hole 4.2: 0(196.596,138.557)
  round 0 hole 5: 0(222,183)

## Via types
v1: diameter 0.5, hole 0.3, Top Layer to Bottom Layer, tented both sides, 1270 vias
v2: diameter 0.6, hole 0.3, Top Layer to Bottom Layer, tented both sides, 48 vias
v3: diameter 1, hole 0.6, Top Layer to Bottom Layer, tented both sides, 37 vias

## Nets (pads, with @x,y where several pads share a name; then routed paths per layer and width w, separated by ;. In a path a pad name is that pad's centre, name@x,y a point inside that pad or via, vN(x,y) a via of type N, cw(c..) or ccw(c..) an arc to the next point about the centre after c; other vN are vias at no path point)
1.8V: 700.15 C704.2 R701.2 R702.2 R716.2 R717.2 R718.2 R719.2 U700.1 | length 64.7
  Top Layer w0.5: R718.2@187.75,165.25 R717.2@188.75,165.25 R719.2@189.75,165.25 R701.2@190.75,165.25 R702.2@191.75,165.25 ; R702.2@191.8,165.2 R702.2@191.75,165.25 ; C704.2@193.25,162 193.25,164.25 192.25,165.25 R702.2@191.75,165.25 ; 700.15@203.019,178.019 700.15@203,178 203,161.7 v1(203.525,161.175) ; R716.2@210.75,140.5 210.75,143 v1(216.25,148.5)
  Bottom Layer w0.5: v1(193.25,163.2) 201.525,163.2 v1@203.537,161.187 ; v1(203.525,161.175) 203.575,161.175 v1(216.25,148.5)
3.3V: `.1 C208.2 C209.1 C402.2 C405.2 C406.2 C407.2 C705.2 D500.1 L203.2 L502.1 R300.2 R401.2 R403.1 R404.1 R703.2 R704.2 R720.2 R721.2 R722.2 U202.2 U400.9 U400.24 U400.36 U400.48 U700.20 U900.4 | length 253
  Top Layer w0.254: U400.9@209.4,122.475 211.275,122.475 211.7,122.9 211.7,124
  Top Layer w0.5: U900.4@163.246,117.718 164.739,117.718 165.032,117.425 v1(165.032,115.782) ; v3(173.75,93.85) D500.1@175.5,93.85 ; v1(186.4,152.5) R722.2@187.25,152.5 R721.2@188.25,152.5 R720.2@189.25,152.5 R704.2@190.25,152.5 192.5,152.5 193.25,153.25 193.25,153.95 ; 211.7,124 211.7,124.8 211.5,125 211.5,126.207 211.793,126.5 C402.2@212.5,126.5 R401.2@213.75,126.5 v3(213.75,127.55) ; C407.2@212,115.25 v1(212,116.5) ; R403.1@213.25,114.25 213.25,113.65 v1(213.7,113.2)
  Top Layer w0.6: L203.2@169,115.027 169,114 v1(169.5,113.5) 183,113.5 ; `.1@172.75,122 R300.2@172.75,125 ; 193.25,153.95 C705.2@193.25,156 ; R404.1@196,126 200.5,126
  Top Layer w0.9: L502.1@165.475,104.5 v3(165.475,106.25)
  Top Layer w1: U202.2@176.202,117.25 179,117.25 U202.2@182.298,117.25 ; v3(194.5,117) 194.5,115.275 197.4,112.375 206.125,112.375 v3(208.15,114.4)
  Bottom Layer w0.5: v1(169.5,113.5) 165.75,113.5 165.032,114.218 v1(165.032,115.782) 165.032,121.032 167,123 167,127 167.5,127.5 168.5,127.5 ; v1(172.7,123.5) 172.7,127.1 172.3,127.5 168.5,127.5 ; v1(186.4,152.5) 186.4,145.65 185.25,144.5 169.5,144.5 168.5,143.5 168.5,127.5 ; v1(212,116.5) 212,114.9 v1(213.7,113.2)
  Bottom Layer w0.6: v3@200.5,127.899 v3(200.5,127.95)
  Bottom Layer w1: v3(165.475,106.25) 165.475,96.625 168.25,93.85 v3(173.75,93.85) 174.65,93.85 175.8,95 175.8,100.914 176.386,101.5 185,101.5 v3(196.65,113.15) ; v3(182.75,108.75) 182.75,112.75 187,117 v3(194.5,117) v1(197.25,117) v1(198.5,117) 200,118.5 200,127.45 v3(200.5,127.95) ; v3(208.15,114.4) 208.15,115.65 209,116.5 v1(212,116.5) 214.2,118.7 214.2,127.1 v3(213.75,127.55)
GND: BT400.2 C201.1 C202.1 C203.2 C204.2 C205.1 C208.1 C209.2 C400.1 C401.1 C402.1 C403.1 C404.1 C405.1 C406.1 C407.1 C500.1 C501.1 C502.2 C503.2 C600.2 C601.1 C602.2 C603.1 C801.1 C802.2 C803.1 C900.1 D200.1 IC200.1 IC200.EPAD IC.1 L701.1 MD500.1 MD500.10 MD500.12 MD500.28 P100.5 P100.8 P300.2 P600.2 P601.1 P602.2 P800.2 R201.1 R203.1 R204.1 R205.1 R400.1 R405.1 R605.1 R607.1 R620.1 R803.1 R804.1 R806.1 R901.1 R902.1 T601.2 T801.2 T905.1 U202.1 U400.8 U400.23 U400.35 U400.47 U601.2 U900.2 | length 78
  Top Layer w0.254: U400.35@200.7,118.975 203.15,118.975 ; U400.47@207.3,116.875 207.3,118.4 ; 207.4,121.975 U400.8@209.4,121.975 212.525,121.975
  Top Layer w0.5: v1(145.5,154.35) C603.1@146.5,154.35 ; R607.1@149,155.35 v1(149,156.5) ; C601.1@161.25,165.5 R620.1@161.25,166.65 ; C900.1@169.25,110.5 C801.1@172.25,110.5 ; R205.1@179.25,142.75 R203.1@179.25,141.75 v1(180.5,141.75) v1(181.75,141.75) v1(183,141.75) v1(184.5,141.75) v1(185.75,141.75) 186.25,141.75 187.25,140.75 R204.1@187.25,138.75 ; C205.1@187.25,134.75 187.5,135 R201.1@187.5,136.25 ; v1(209.85,114.25) R400.1@210.75,114.25 C407.1@212,114.25 ; C403.1@215.75,114.25 v1(217,113) ; C404.1@215.75,119.5 C401.1@215.75,123 ; C400.1@215.75,126.5 v1(215.75,128.707) 215.843,128.8 220.957,128.8 221.25,128.507 v1@221.25,128 ; v1(221.25,120.475) 221.25,121
  Top Layer w0.6: R804.1@145.25,149.25 C803.1@145.25,150.5 v1(145.25,151.75) ; v1(200.5,129.5) R405.1@202,129.5
  Top Layer w1: v1(217,113) v1(218.75,113) v1(220.25,113) v1(222,113) v1(223.75,113) 226.25,113 v1(226.25,117) v1(226.25,118.25) v1(226.25,119.75) 226.25,121 v1(225.5,121) v1(224,121) v1(222.5,121) 221.25,121 v1(221.25,121.5) v1(221.25,123) v1(221.25,124.5) v1(221.25,126) v1(221.25,127.25) v1@221.25,128
  other v1: 184,86 186,86 188,86 190,86 192,86 194,86 196,86 198,86 200,86 202,86 204,86 206,86 208,86 210,86 177,88 179,88 181,88 183,88 185,88 187,88 189,88 191,88 193,88 195,88 197,88 199,88 201,88 203,88 205,88 207,88 209,88 211,88 213,88 215,88 174,90 178,90 180,90 182,90 184,90 186,90 188,90 190,90 192,90 194,90 196,90 198,90 200,90 202,90 204,90 206,90 208,90 210,90 212,90 214,90 216,90 218,90 169,92 171,92 173,92 185,92 187,92 189,92 191,92 193,92 195,92 197,92 199,92 201,92 203,92 205,92 207,92 209,92 211,92 213,92 215,92 223,92 183.25,92.25 167.5,92.75 168.75,92.75 169.75,92.75 170.75,92.75 172,92.75 173.25,92.75 184.25,92.75 166.75,93.5 183.25,93.5 185,93.5 166,94 184.25,94 186,94 188,94 190,94 192,94 194,94 196,94 198,94 200,94 202,94 204,94 206,94 208,94 210,94 212,94 216,94 222,94 224,94 226,94 165.3,94.5 183.25,94.5 164.75,95 169,95 170,95 184,95 185,95 181.5,95.5 182.75,95.5 180.1,95.6 163.9,95.7 169.75,95.75 230,95.75 163,96 169,96 181,96 199,96 201,96 203,96 205,96 207,96 209,96 211,96 213,96 215,96 217,96 219,96 221,96 223,96 225,96 227,96 229,96 171.75,96.25 163,96.7 171.5,97 181.25,97 230,97.25 229.25,97.75 178,98 180,98 200,98 202,98 204,98 206,98 208,98 210,98 212,98 216,98 218,98 220,98 222,98 224,98 226,98 228,98 230,98.5 181.25,99 229.25,99 159,100 177,100 179,100 181,100 195,100 199,100 201,100 203,100 205,100 207,100 209,100 211,100 213,100 215,100 217,100 219,100 221,100 223,100 225,100 227,100 229,100 230,100 229.25,101 230,101.25 160,102 188,102 190,102 192,102 194,102 196,102 198,102 200,102 202,102 204,102 206,102 208,102 210,102 212,102 216,102 218,102 224,102 226,102 228,102 229.25,102 230,102.5 229.25,103.25 230,103.75 155,104 161,104 189,104 191,104 193,104 195,104 197,104 199,104 201,104 203,104 205,104 207,104 209,104 211,104 225,104 227,104 229,104 229.25,105 230,105.25 154,106 156,106 160,106 162,106 164,106 192,106 194,106 196,106 198,106 200,106 202,106 204,106 206,106 208,106 210,106 212,106 224,106 226,106 228,106 229.25,106.25 230,106.5 229.25,107 230,107.75 165,108 167,108 169,108 193,108 195,108 197,108 199,108 201,108 203,108 205,108 207,108 209,108 211,108 225,108 227,108 229,108 173.75,108.5 175,108.75 176,108.75 177,108.75 178,108.75 179,108.75 229.25,109 230,109 174.75,109.75 179.5,109.75 196,110 198,110 200,110 202,110 204,110 206,110 208,110 210,110 218,110 224,110 226,110 228,110 178.75,110.25 230,110.25 174.5,110.75 179.5,111 169.25,111.5 170.25,111.5 171.25,111.5 172.25,111.5 174.5,111.75 178.75,111.75 161,112 163,112 167,112 217,112 218,112 219,112 220.25,112 221,112 222,112 223,112 224,112 225,112 226,112 179.5,112.25 174.5,112.5 217.875,113 219.5,113 221.125,113 222.875,113 224.7,113 225.8,113 217.25,113.5 218.5,113.5 219.75,113.5 220.75,113.5 222.25,113.5 223.25,113.5 224.25,113.5 216.375,113.625 162.25,113.75 163.25,113.75 225.25,113.75 226.3,113.9 164,114 225.25,115 226.25,115 159,116 225.25,116 227,116 229,116 226.2,116.2 230,116.75 225.25,117.25 226.25,117.625 209,117.75 210,117.75 211,117.75 215,117.8 152,118 225.25,118.25 230,118.5 168.5,119 169.75,119 171,119 178.75,119 226.25,119 172.25,119.25 173.25,119.25 174.25,119.25 225.25,119.25 178,119.5 193.75,119.5 194.75,119.5 196,119.5 198.75,119.5 167.75,119.75 179.25,119.75 213.1,119.8 220.85,119.975 172.25,120 173.25,120 181,120 217,120 217.75,120 218.5,120 219.25,120 220,120 222,120 223,120 224,120 225,120 227,120 229,120 230,120 174.25,120.25 178.5,120.25 215.7,120.3 218,120.5 219.5,120.5 220.375,120.575 216.925,120.625 179.75,120.75 168,121 173.75,121 174.75,121 175.5,121 176.75,121 203.15,121 177.75,121.25 215.75,121.25 202,121.3 202.7,121.4 230,121.5 220.5,121.75 146,122 148,122 150,122 152,122 173.75,122 174.75,122 175.75,122 176.75,122 178,122 180,122 188,122 202,122 222,122 224,122 226,122 228,122 202.7,122.1 215.8,122.1 212.5,122.25 221.25,122.25 203.1,122.5 202.1,122.6 213.05,122.6 220.5,122.75 230,122.75 202.7,123 212.5,123 202.2,123.3 213.1,123.4 220.5,123.5 212.5,123.75 221.25,123.75 174.5,124 175.5,124 181,124 189,124 191,124 202.25,124 223,124 225,124 227,124 230,124 213.1,124.15 212.5,124.5 220.5,124.5 198.75,124.75 210.125,124.9 198.25,125 201.25,125 174.5,125.25 175.5,125.25 220.5,125.25 221.25,125.25 230,125.25 209.625,125.45 144,126 166,126 180,126 190,126 192,126 210,126 222,126 224,126 226,126 220.5,126.25 209.55,126.55 203,127 210,127 203.6,127.05 220.5,127.25 209.525,127.45 215.75,127.604 203.5,127.75 210,127.95 149,128 189,128 191,128 193,128 195,128 197,128 199,128 211,128 215,128 221,128 223,128 225,128 209.525,128.375 220.75,128.75 217.5,129 218.75,129 199.5,129.5 165.75,129.75 167.25,129.75 148,130 190,130 192,130 194,130 196,130 198,130 210,130 212,130 214,130 216,130 218,130 220,130 222,130 224,130 226,130 199.5,130.25 200.5,130.25 202,130.5 203,130.5 204,130.5 152,131.5 153,131.5 165.75,131.5 167,131.5 149.75,131.75 150.75,131.75 145,132 147,132 149,132 165,132 171,132 189,132 191,132 149.75,132.75 150.75,132.75 165.75,133.25 167,133.25 149.75,133.75 150.75,133.75 144,134 146,134 148,134 166,134 181,134.25 182.25,134.25 183.75,134.25 185,134.25 151.75,134.5 152.75,134.5 153.75,134.5 149.75,134.75 150.75,134.75 165.75,134.75 167,134.75 149.75,135.75 150.75,135.75 165,136 180.25,136 181.75,136 165.75,136.5 167,136.5 181,137 166,138 180.25,138 181.75,138 180,146 182,146 184,146 181,148 187.5,148.5 189.75,148.75 190.5,148.75 187.5,149.25 189.75,149.5 190.5,149.5 144,150 187.5,150 185.5,150.25 189.75,150.25 190.5,150.25 191.25,150.25 149.25,150.75 150.25,150.75 151.25,150.75 187.5,150.75 189.75,151 190.5,151 191.25,151 185.5,151.25 152.75,151.5 187.5,151.5 149.25,151.6 150.25,151.6 151.25,151.6 165,152 167,152 171,152 175,152 177,152 179,152 181,152 183,152 185.5,152 149.25,152.5 150.25,152.5 151.25,152.5 152.75,152.5 185.5,153 162,154 166,154 170,154 176,154 178,154 180,154 182,154 184,154 185.5,154 185.5,154.75 167,156 171,156 175,156 177,156 179,156 181,156 183,156 146,158 148,158 162,158 166,158 170,158 172,158 176,158 178,158 180,158 182,158 147,160 149,160 153,160 155,160 173,160 175,160 177,160 179,160 181,160 148,162 162,162 149.8,162.3 151.05,162.3 152.3,162.3 153.5,162.3 149.8,163.3 151.05,163.3 152.3,163.3 153.55,163.3 149,164 155,164 149.8,164.3 151.05,164.3 152.3,164.3 153.55,164.3 149.8,165.3 151.05,165.3 152.3,165.3 153.55,165.3 150,166 152,166 154,166 158,166 160,166 162,166 151,168 153,168 155,168 159,168 169,168 154,170 159,170 160.25,170 161.5,170 162.7,170 168,170 170,170 159,171 160.25,171 161.5,171 162.75,171 155,172 159,172 160.25,172 161.5,172 162.75,172 165,172 167,172 169,172 159,173 160.25,173 161.5,173 162.75,173 179,176 181,176 179,180 188.325,181.15 187.275,181.9 178,182 184,182 188.325,182.025 167,184 169,184 171,184 173,184 175,184 177,184 179,184 183,184 172,186 174,186 176,186 178,186 180,186 182,186 184,186 179.75,187 182.75,187 179.75,187.75 182.75,187.75 175,188 177,188 179,188 185,188 187,188 189,188 191,188 193,188 179.75,188.5 182.75,188.5 179.75,189.25 182.75,189.25 180,190 180.75,190 181.5,190 182.25,190 184,190 186,190 188,190 190,190 187,192 189,192 191,192
  other v2: 196.596,95.204 193.976,95.416 184.745,95.766 186.345,95.766 187.945,95.766 189.545,95.766 191.145,95.766 195.178,95.861 192.64,96.204 195.84,96.214 185.545,96.39 187.145,96.39 188.745,96.39 190.345,96.39 196.991,96.433 194.297,96.636 184.745,97.027 186.345,97.027 187.945,97.027 189.545,97.027 191.145,97.027 192.745,97.027 198.383,97.154 197.122,97.172 197.652,98.216 197.145,98.772 185.078,98.973 186.678,98.973 188.278,98.973 189.878,98.973 191.478,98.973 193.078,98.973 185.564,99.345 187.478,99.61 189.078,99.61 190.678,99.61 197.937,99.753 195.9,99.778 192.14,99.806 196.724,99.837 193.601,100.001 185.078,100.234 186.678,100.234 188.278,100.234 189.878,100.234 191.478,100.234 193.516,100.613 195.554,100.991
GPS_PWR: L501.1 L502.2 R503.2 T500.2 | length 3.2
  Top Layer w0.254: T500.2@163,100.8 162.95,100.85 162.95,102.851 163.099,103 R503.2@164,103
GPS_VCC: C500.2 C501.2 C502.1 L501.2 MD500.8 T500.3 | length 3.1
  Top Layer w0.5: L501.2@160.9,98.6 T500.3@164,98.6
GSM.DTR: 700.3 R719.1 U700.4 | length 47.6
  Top Layer w0.254: U700.4@189.725,161.95 189.737,161.962 189.737,164.238 R719.1@189.75,164.25 ; v1(215,176.475) 700.3@215,178
  Bottom Layer w0.254: v1(189.75,163.6) 187.075,166.275 187.075,176.4 188.775,178.1 208.6,178.1 210.925,175.775 214.3,175.775 v1(215,176.475)